# EAGLE board part3c-bistable (EAGLE 9.7.0)

Size 192.75 x 67.94 mm. Coordinates in mm from the lower left corner, seen from the top.
Outline: 0,0 192.75,0 192.75,67.94 0,67.94 0,0
Copper layers (1*16): Top 0.035mm / dielectric 1.5mm / Bottom 0.035mm
Design rules "default": minimum track width 6mil, minimum drill 0.35mm, track to track 6mil, track to pad 6mil, pad to pad 6mil, via to via 6mil, smd to smd 6mil, copper to edge 40mil, drill to drill 6mil, minimum pad ring 10mil, minimum via ring 8mil, stop-mask expansion 4mil, vias tented up to drill 0mil, thermal gap 10mil

## Footprints (pad centres in the part's own frame; a part is rotated, then mirrored left to right if it is on the bottom)
CAP-THRU-2.54MM = drill 1.016 pad 1.88: 1 -1.27,0; 2 1.27,0
LEDRD254W60D565H860B_Y = drill 0.981 pad 1.581: 1 -1.27,0; 2 1.27,0
BATTERY-GENERIC = drill 1.118 pad 3.15 octagon: + 2.54,0; - -2.54,0
RESAD1016W63L850D250B = drill 0.83 pad 1.43: 1 -5.08,0; 2 5.08,0
SWITCH-SPDT-PTH-8.5X3.7MM = drill 1.016 pad 1.88: 1 -2.54,0; 2 0,0; 3 2.54,0
DIP826W53P254L959H508Q8B = drill 0.786 pad 1.386: 1 -4.13,3.81; 2 -4.13,1.27; 3 -4.13,-1.27; 4 -4.13,-3.81; 5 4.13,-3.81; 6 4.13,-1.27; 7 4.13,1.27; 8 4.13,3.81

## Placement (x,y rotation side)
C2  0.1u  [CAP-THRU-2.54MM]  44.55,51.44 270 top
C4  0.1u  [CAP-THRU-2.54MM]  186.79,5.71 270 top
C7  0.1u  [CAP-THRU-2.54MM]  162.66,40.01 0 top
D3  YELLOW  [LEDRD254W60D565H860B_Y]  170.28,24.77 180 top
P1  BATTERYGENERIC  [BATTERY-GENERIC]  8.26,59.68 180 top
R7  220  [RESAD1016W63L850D250B]  169.01,12.06 90 top
R8  1k  [RESAD1016W63L850D250B]  156.31,9.53 90 top
R9  1k  [RESAD1016W63L850D250B]  161.39,9.53 90 top
S2  TOGGLE  [SWITCH-SPDT-PTH-8.5X3.7MM]  141.07,22.23 0 top
U3  LM555_DIP  [DIP826W53P254L959H508Q8B]  157.58,28.57 90 top

## Library data of the parts
C2 C4 C7 P1 R7-R9 S2 = Tinkercad
D3 = Tinkercad; CATEGORY: Opto-Electronic; SUB-CATEGORY: LED; VALUE: LED_YELLOW
U3 = Tinkercad; CATEGORY: IC_Clock-Timing; CURRENT-SUPPLY: 10mA; DESCRIPTION: IC OSC SINGLE TIMER 100KHZ 8-DIP; FREQUENCY: 100kHz; MANUFACTURER: Texas Instruments; MPN: LM555CN/NOPB; OPERATING_TEMP: 0°C to 70°C; PART_STATUS: Active; ROHS_COMPLIANT: ROHS3 Compliant; SUB-CATEGORY: Timer

## Nets
D3_C: D3.2 R7.2
P1+: C2.2 C4.2 P1.+ R8.1 R9.1 U3.8
P1-: C2.1 C4.1 C7.2 P1.- R7.1 S2.2 U3.1 U3.6
U3_!RST: R9.2 S2.1 U3.4
U3_CV: C7.1 U3.5
U3_OUT: D3.1 U3.3
U3_TR: R8.2 S2.3 U3.2

## Tracks (layer width: path | path; a pad name or v marks a point on that pad's centre or on a via)
D3_C  (1 unrouted)
P1+  (5 unrouted)
P1-  (7 unrouted)
U3_!RST  (2 unrouted)
U3_CV  (1 unrouted)
U3_OUT  (1 unrouted)
U3_TR  (2 unrouted)